# Altium PCB NewTrackerSenseBoard.PcbDoc (part 1 of 2)
Units mm, origin at the board's own origin, x right, y up, seen from the top; angles counter-clockwise.
Board outline 40 x 30 mm, 4 copper layers (L1 (SIG), L2 (GND), L3 (GND), L4 (SIG + PWR)), stack 1.566 mm thick; 46 components, 30 nets, 198 pads, 124 vias.
Unrouted connection lines stored in the file: 48.
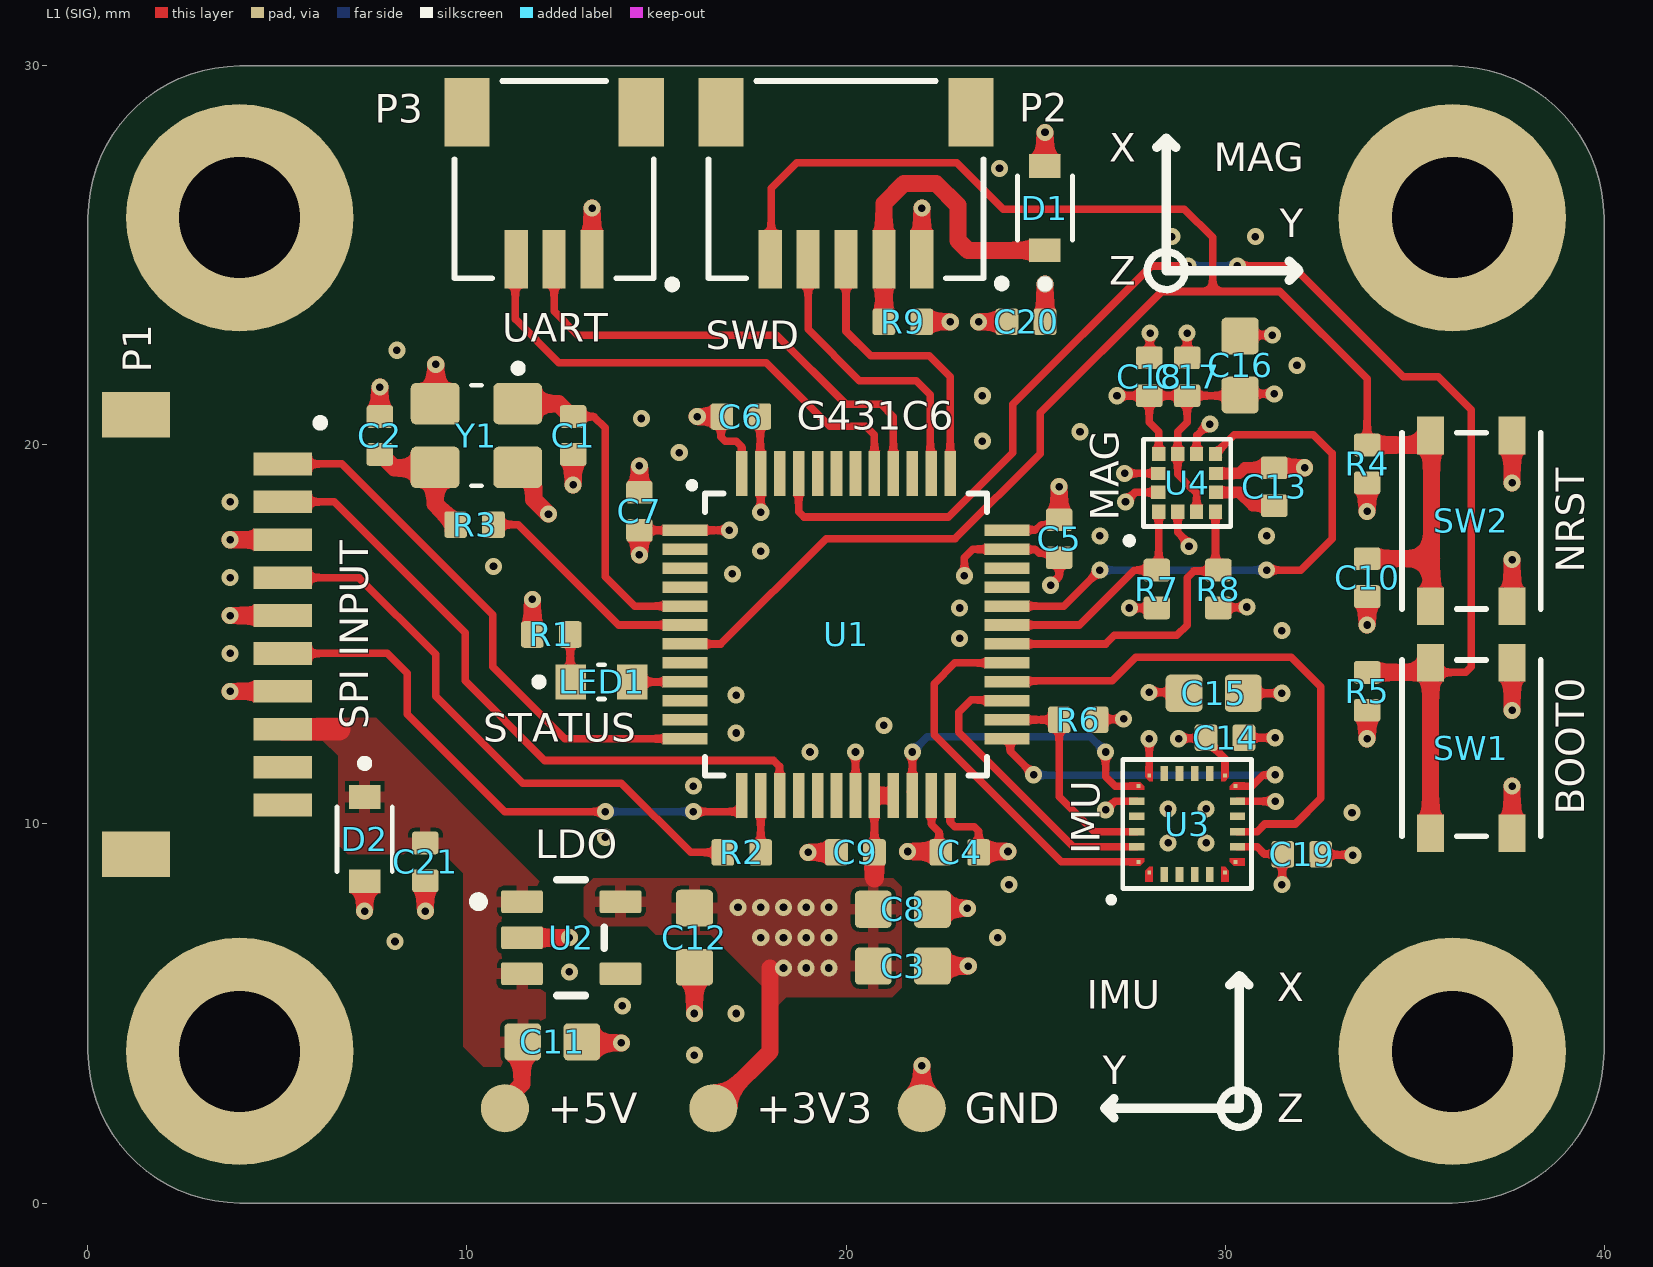
[diagram p0: L1 (SIG) view]
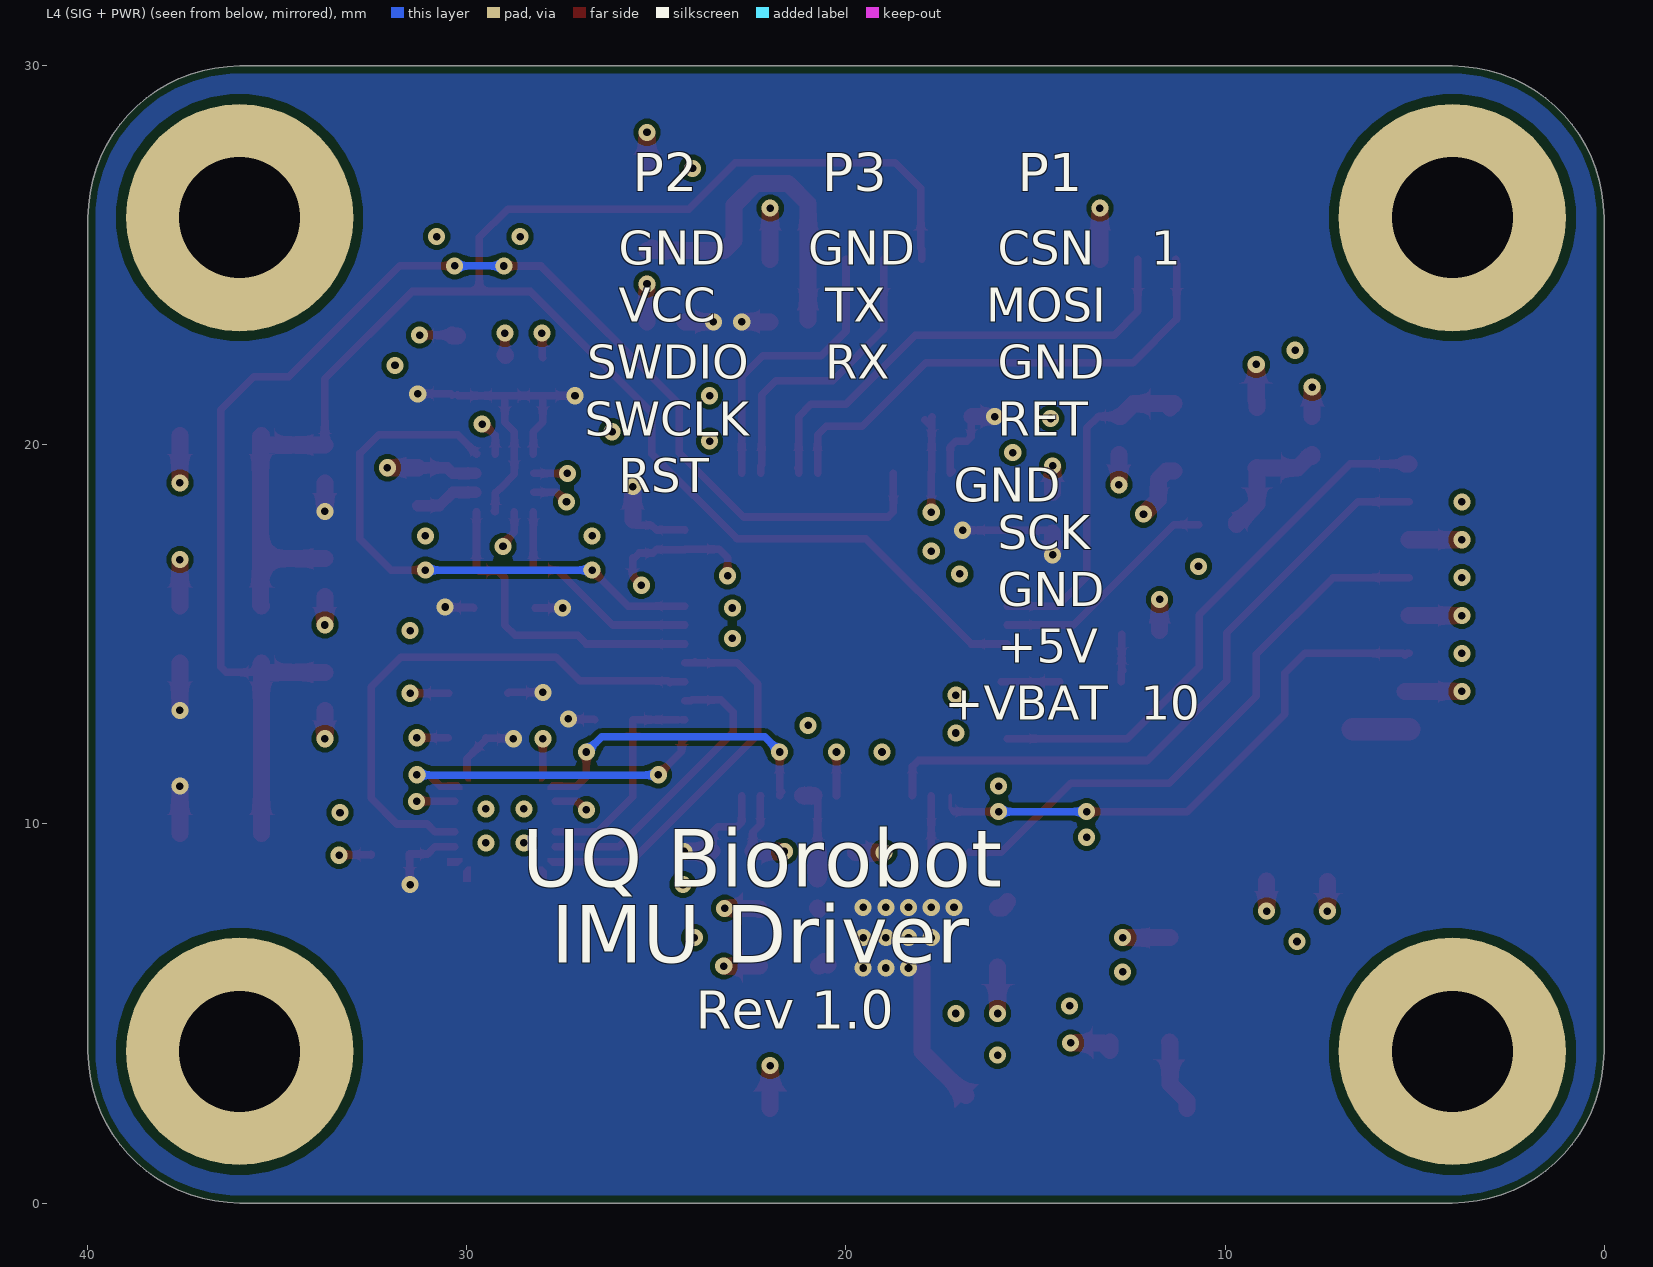
[diagram p1: L4 (SIG + PWR) view, seen from below]
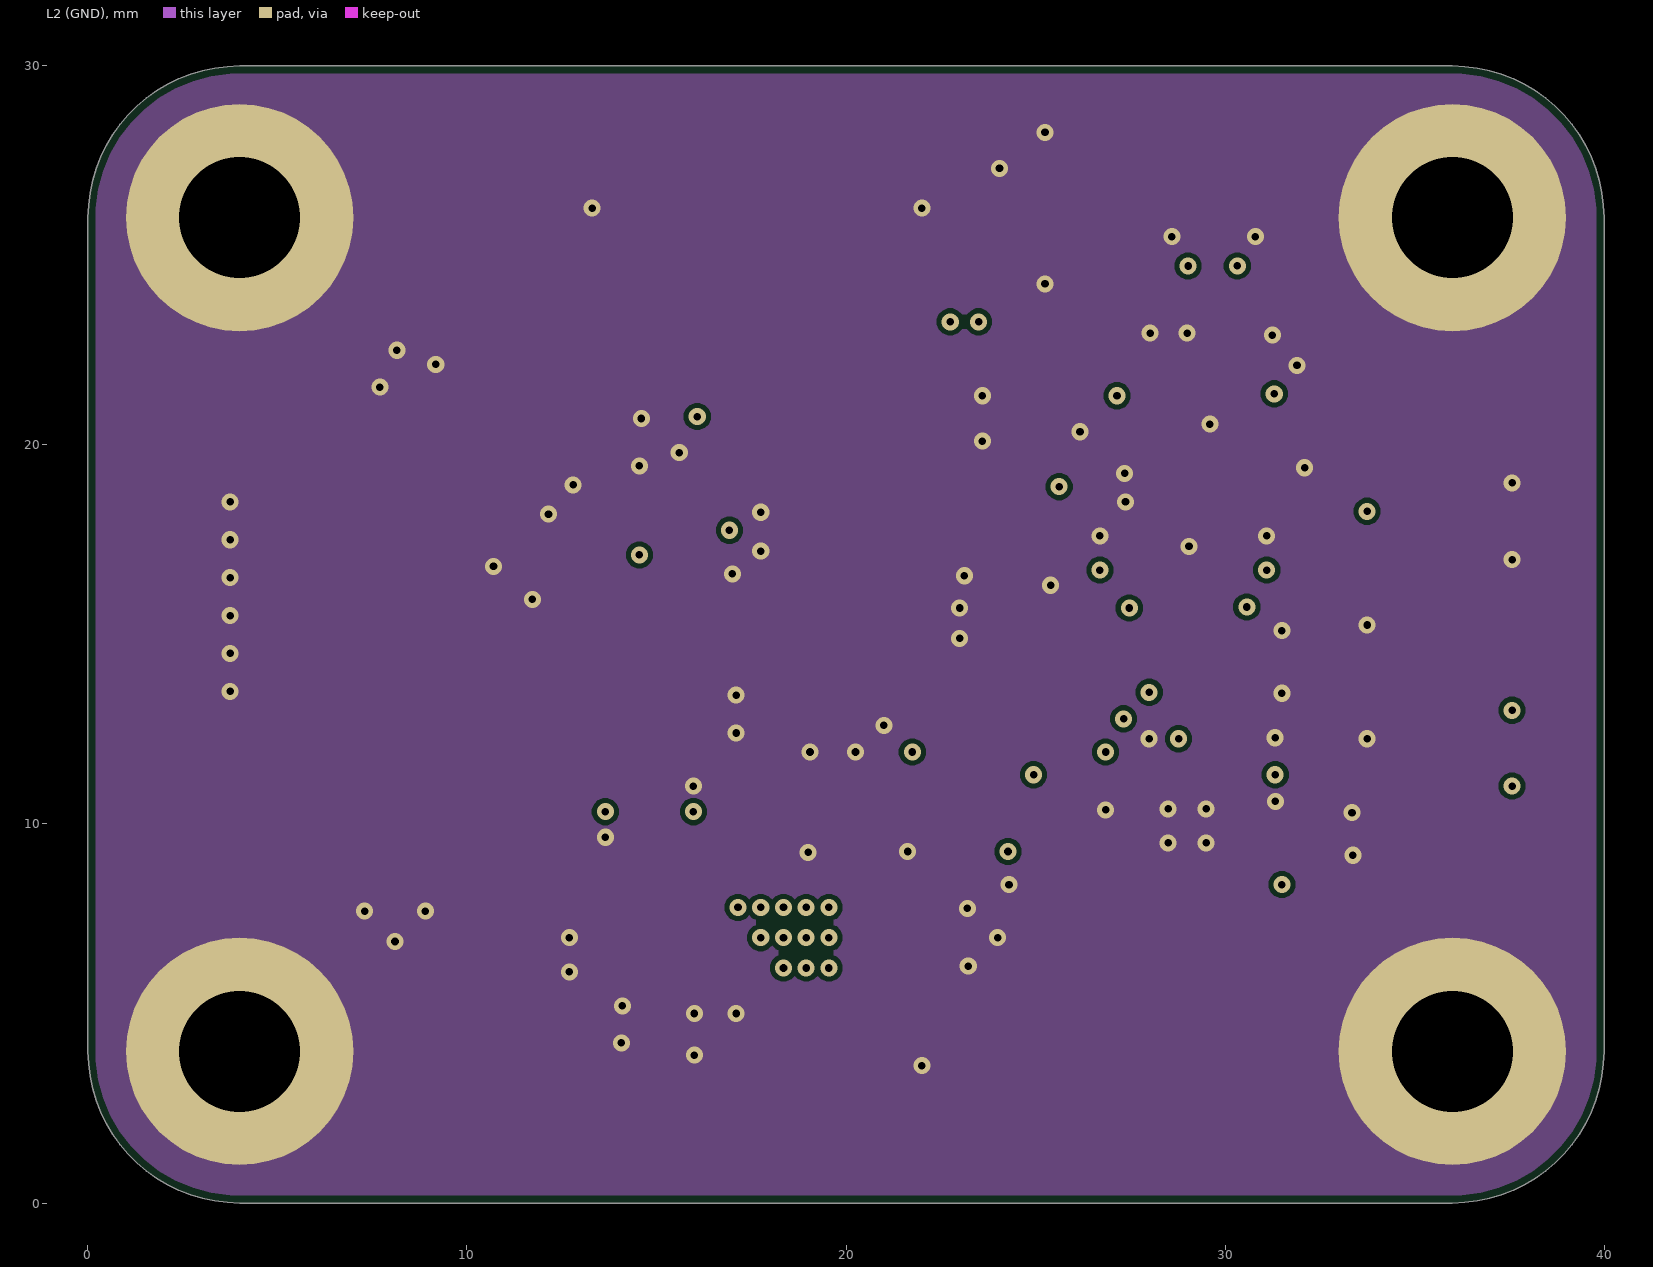
[diagram p2: L2 (GND)]
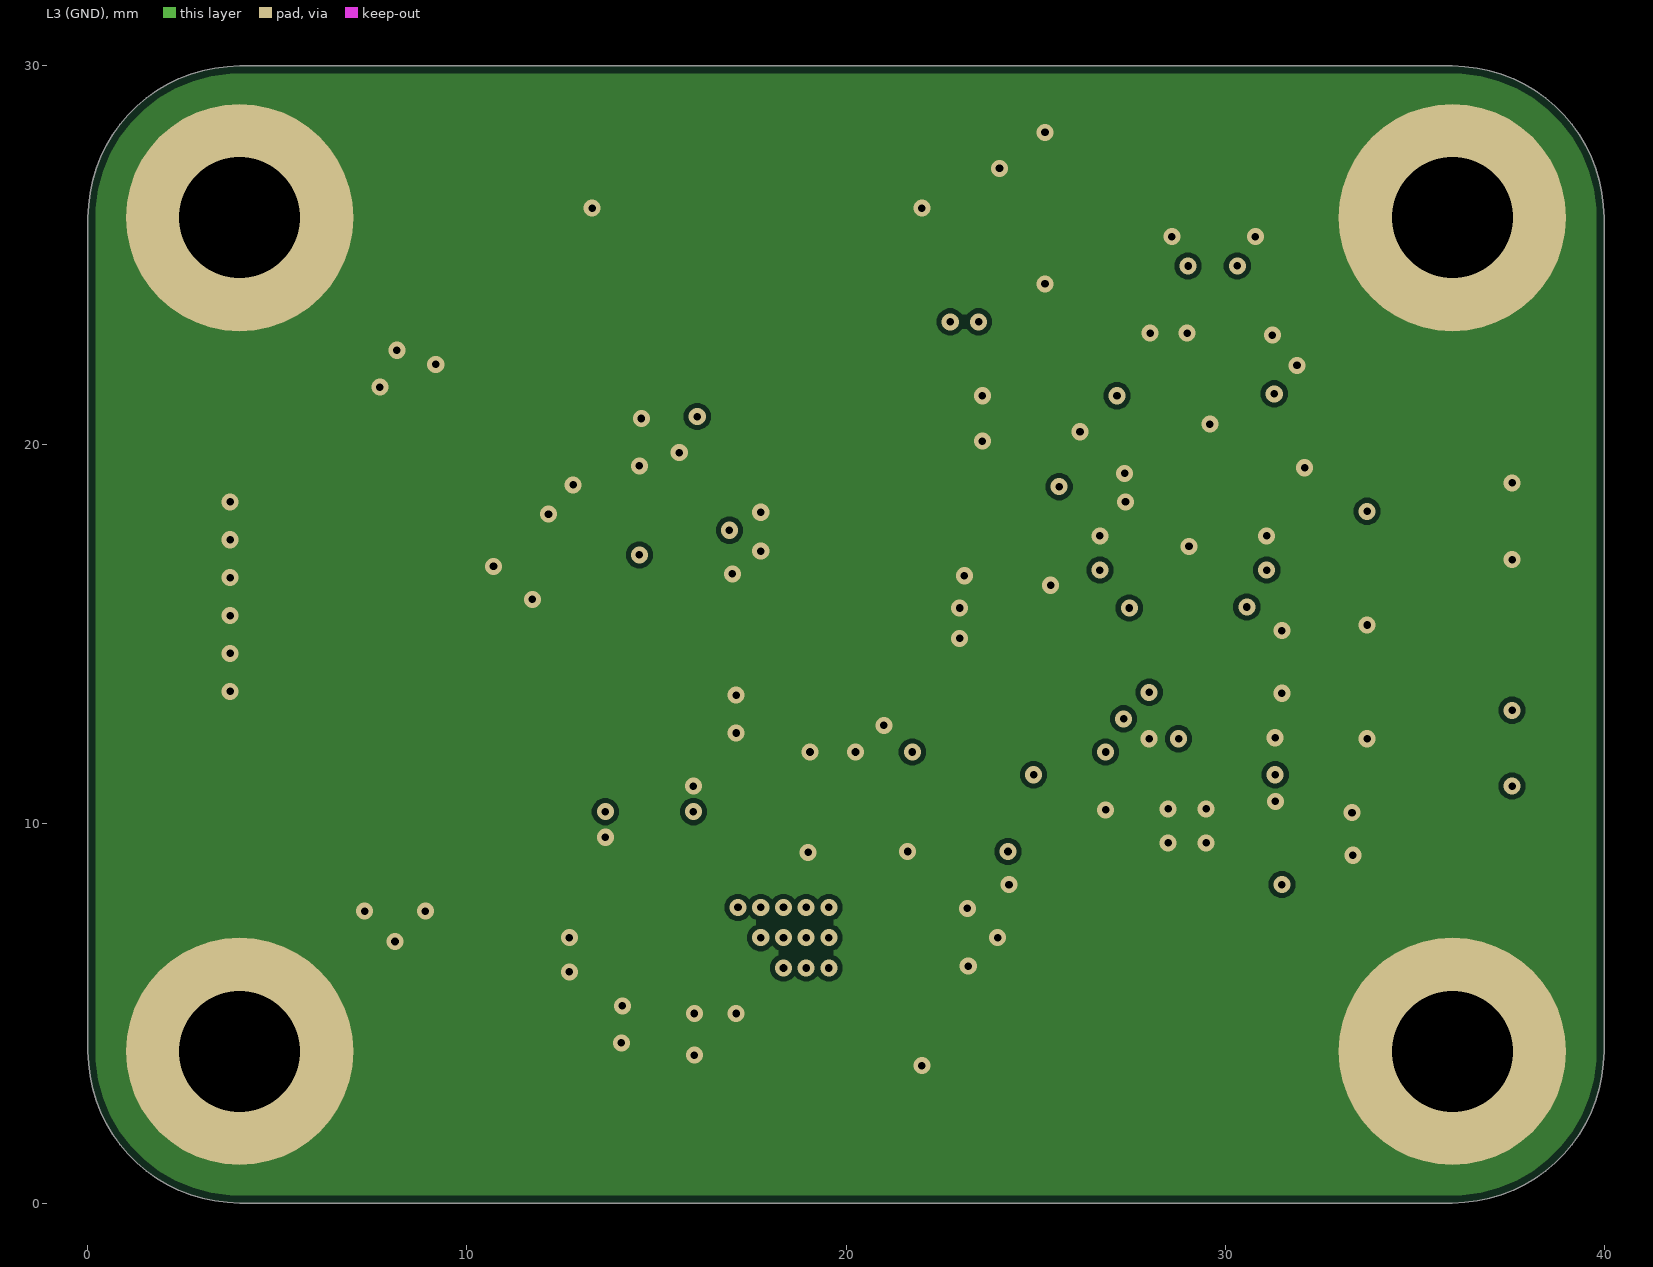
[diagram p3: L3 (GND)]
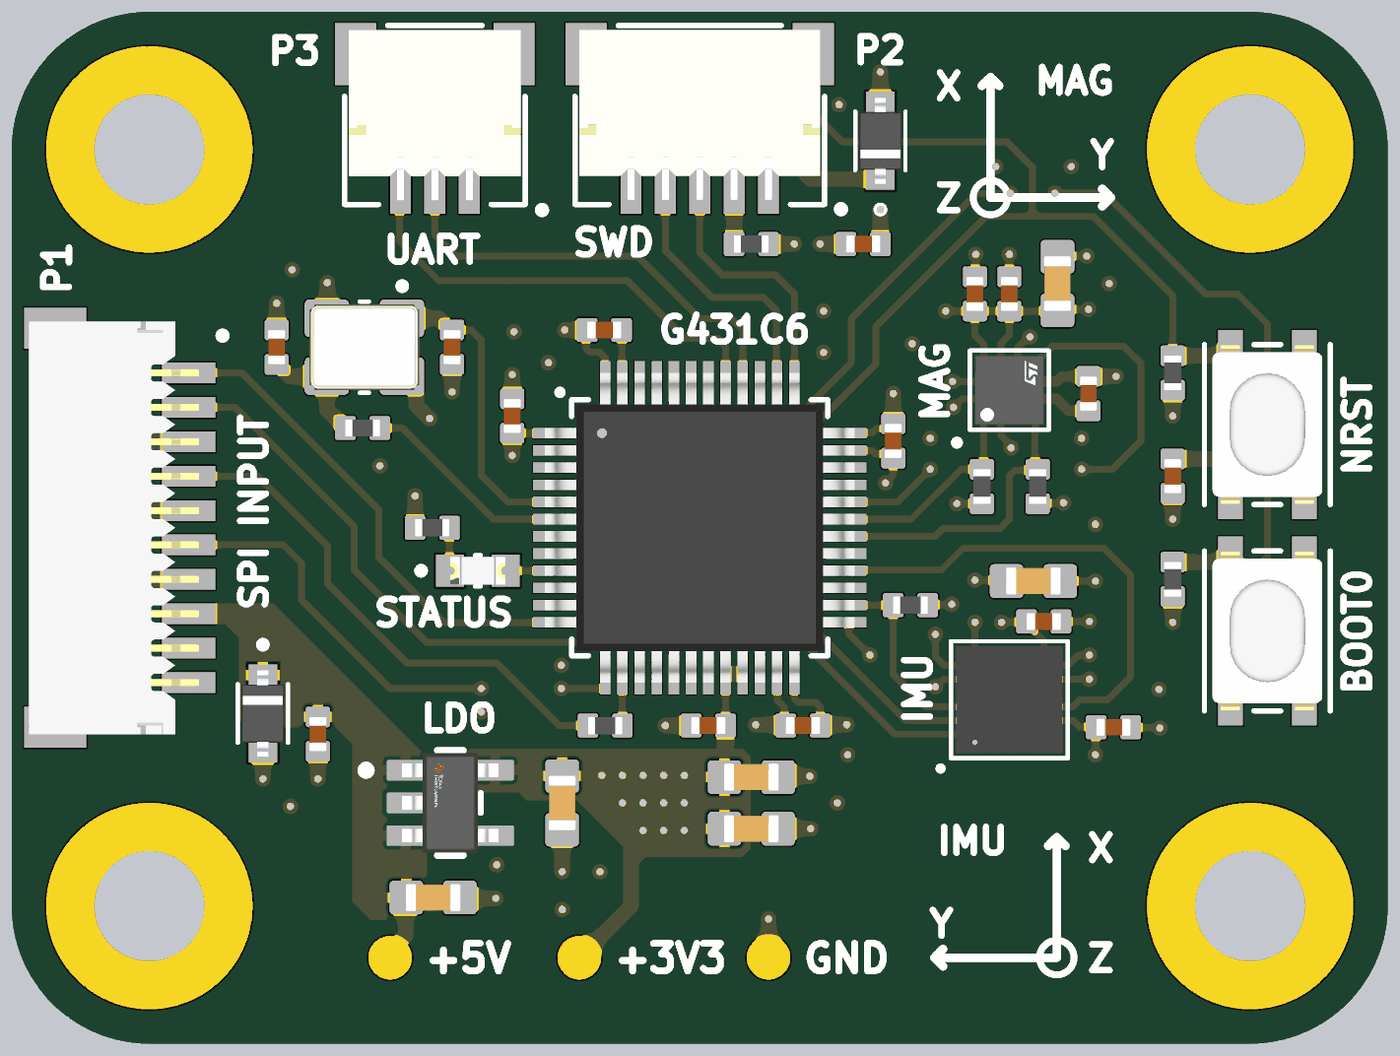
[diagram p4: 3D render of the assembled board from above, using the file's embedded part models]

## Layer stack, top to bottom
Top Solder: solder mask 0.0254, SM-001, Dk 4
L1 (SIG): signal copper 0.035
Dielectric 1: prepreg 0.203, PP-017, Dk 4.4
L2 (GND): signal copper 0.03
Dielectric 3: core 1.03, Core-039, Dk 4.6
L3 (GND): signal copper 0.03
Dielectric 5: prepreg 0.203, PP-017, Dk 4.4
L4 (SIG + PWR): signal copper 0.035
Bottom Solder: solder mask 0.0254, SM-001, Dk 4

## Board outline
0,4 0,26 cw(c4,26) 4,30 36,30 cw(c36,26) 40,26 40,4 cw(c36,4) 36,0 4,0 cw(c4,4)

## Design rules (kind name [scope] priority, off if disabled: settings)
BoardOutlineClearance [All] p1: gap=0.2 ignorepadtopadclearanceinfootprint=FALSE
Clearance [All] p1: gap=0.127 ignorepadtopadclearanceinfootprint=FALSE except(0.102: Arc-Text Track-Text SMDPad-Text THPad-Text Fill-Text Poly-Text Region-Text Text-Text; 0.12: Arc-Arc Arc-Track Track-Track; 0.15: Arc-SMDPad Arc-Via Track-SMDPad Track-Via SMDPad-SMDPad SMDPad-THPad THPad-THPad Fill-Fill Fill-Poly Fill-Region Poly-Poly Poly-Region Region-Region; 0.2: Arc-THPad Track-THPad; 0.25: Arc-Hole Track-Hole SMDPad-Hole THPad-Fill THPad-Poly THPad-Region THPad-Hole Via-Hole Fill-Hole Poly-Hole Region-Hole Text-Hole)
DiffPairsRouting [InDifferentialPairClass('USBCONN_DIFF')] p1: maxlimit=0.127 minlimit=0.102 mostfreqgap=0.127 toplayer_mingap=0.127 toplayer_minwidth=0.2 toplayer_maxwidth=0.2 toplayer_prefwidth=0.2 midlayer1_minwidth=0.381 midlayer1_maxwidth=0.381 midlayer1_prefwidth=0.381 midlayer2_minwidth=0.381 midlayer2_maxwidth=0.381 midlayer2_prefwidth=0.381 bottomlayer_mingap=0.127 bottomlayer_minwidth=0.2 bottomlayer_maxwidth=0.2 bottomlayer_prefwidth=0.2 impedanceprofiledriven=TRUE maxuncoupledlength=12.7
HoleSize [All] p1: absolutevalues=TRUE maxlimit=6.3 minlimit=0.2 maxpercent=80.000 minpercent=20.000
HoleToHoleClearance [All] p1: gap=0.25 allowstackedmicrovias=FALSE
MinimumAnnularRing [All] p1: minimumring=0.12
MinimumSolderMaskSliver [All] p1: minsoldermaskwidth=0.1
PlaneClearance [All] p1: clearance=0.15
PlaneConnect PlaneConnectPowerPads [InPadClass('PowerPads')] p1: planeconnectstyle=Direct reliefexpansion=0.508 reliefentries=4 reliefconductorwidth=0.254 reliefairgap=0.254
PlaneConnect [All] p2: planeconnectstyle=Direct reliefexpansion=0.3 reliefentries=4 reliefconductorwidth=1 reliefairgap=0.102
PolygonConnect PolygonConnectPowerPads [All vs (InPadClass('PowerPads'))] p1: connectstyle=Direct reliefconductorwidth=0.254 reliefentries=4 polygonreliefangle="90 Angle" airgapwidth=0.254
PolygonConnect [All] p2: thpad.connectstyle=Direct thpad.reliefconductorwidth=0.5 thpad.reliefentries=4 thpad.polygonreliefangle="90 Angle" thpad.airgapwidth=0.102 smdpad.connectstyle=Relief smdpad.reliefconductorwidth=0.3 smdpad.reliefentries=4 smdpad.polygonreliefangle="90 Angle" smdpad.airgapwidth=0.102 via.connectstyle=Direct via.reliefconductorwidth=0.5 via.reliefentries=4 via.polygonreliefangle="90 Angle" via.airgapwidth=0.102
RoutingVias [All] p1: holewidth=0.2 width=0.45 viastyle="Through Hole" minholewidth=0.2 minwidth=0.45 maxholewidth=0.2 maxwidth=0.45
SilkToSilkClearance [All] p1: silktosilkclearance=0
SilkToSolderMaskClearance [IsPad] p1: minsilkscreentomaskgap=0.102 clearancetoexposedcopper=TRUE
SolderMaskExpansion SolderMaskExpansion_1 [IsVia] p1: expansion=0.102 istentingtop=TRUE
SolderMaskExpansion [All] p2: expansion=0.075 istentingtop=FALSE
Width [All] p1: maxlimit=0.8 minlimit=0.102 preferedwidth=0.2 minimp=50.000000 maximp=50.000000 favimp=50.000000
22 further rules are at their usual default settings.

## Classes and differential pairs
component class U_Sensors: +3V3 +5v C11 C12 C13 C14 C15 C16 C17 C18 C19 GND IMU R6 R7 R8 U2 U3
component class U_Peripherals: C20 C21 D1 D2 P1 P2 P3 R9
component class U_Mechanical: H1 H2 H3 H4 HW1 HW2 HW3 HW4 HW5 HW6 HW7 HW8 HW9 HW10 HW11 HW12 P4 P5 P6 P7 P8 P9
component class U_MCU: C1 C2 C3 C4 C5 C6 C7 C8 C9 C10 LED1 R1 R2 R3 R4 R5 SW1 SW2 Y1

## Components (designator, comment, footprint, x,y, rotation, side; value= is the part's Value field where it differs from the comment)
+3V3 "50mil TEST_PAD" 15mil_TEST_PAD 16.5,2.5 r0 top (schematic designator TP3)
+5V "50mil TEST_PAD" 15mil_TEST_PAD 11,2.5 r0 top (schematic designator TP2)
C1 "12pF" 0402_Cap 12.8,20.25 r90 top
C2 "12pF" 0402_Cap 7.7,20.25 r90 top
C3 "10uF" 0603_CAP 21.5,6.25 r180 top
C4 "100nF" 0402_Cap 23,9.25 r0 top
C5 "100nF" 0402_Cap 25.625,17.525 r90 top
C6 "100nF" 0402_Cap 17.225,20.75 r180 top
C7 "100nF" 0402_Cap 14.55,18.25 r270 top
C8 "1uF" 0603_CAP 21.5,7.75 r180 top
C9 "10nF" 0402_Cap 20.25,9.25 r0 top
C10 "100nF" 0402_Cap 33.75,16.5 r90 top
C11 "1uF" 0603_CAP 12.25,4.25 r180 top
C12 "1uF" 0603_CAP 16,7 r90 top
C13 "220nF" 0402_Cap 31.3,18.9 r270 top
C14 "100nF" 0402_Cap 30,12.275 r180 top
C15 "2.2µF" 0603_CAP 29.7,13.45 r180 top
C16 "10uF" 0603_CAP 30.4,22.1 r270 top
C17 "100nF" 0402_Cap 29,21.8 r270 top
C18 "100nF" 0402_Cap 28,21.8 r270 top
C19 "10nF" 0402_Cap 32.025,9.2 r180 top
C20 "100nF" 0402_Cap 24.75,23.25 r180 top
C21 "100nF" 0402_Cap 8.9,9 r90 top
D1 "SD05" DIO_MM3Z3V0T1G 25.25,26.25 r90 top
D2 "SD05" DIO_MM3Z3V0T1G 7.3,9.6 r270 top
GND "50mil TEST_PAD" 15mil_TEST_PAD 22,2.5 r0 top (schematic designator TP1)
LED1 "GREEN" 0603_LED 13.55,13.75 r0 top
P1 "SM10B-SRSS-TB" SM10B-SRSS-TB 2.8,15 r270 top
P2 "SM05B-SRSS-TB" SM05B-SRSS-TB 20,27 r180 top
P3 "SM03B-SRSS-TB" SM03B-SRSS-TB 12.3,27 r180 top
R1 "300R" 0402_RES 12.225,15 r0 top
R2 "0R" 0402_RES 17.25,9.25 r0 top
R3 "0R" 0402_RES 10.2,17.9 r0 top
R4 "10K" 0402_RES 33.75,19.5 r270 top
R5 "10K" 0402_RES 33.75,13.5 r90 top
R6 "10K" 0402_RES 26.125,12.75 r0 top
R7 "3K3" 0402_RES 28.2,16.2 r270 top
R8 "3K3" 0402_RES 29.825,16.2 r270 top
R9 "0R" 0402_RES 21.5,23.25 r180 top
SW1 "SPST N.O. Button" "SW4_PTS815 SJM 250 SMTR LFS_CNK" 36.5,12 r270 top
SW2 "SPST N.O. Button" "SW4_PTS815 SJM 250 SMTR LFS_CNK" 36.5,18 r90 top
U1 "STM32G431C6T6" LQFP48-7x7mm 20,15 r0 top
U2 "TPS7A2033PDBVR" FP-DBV0005A-MFG 12.75,7 r0 top
U3 "ICM-40609-D" XDCR_ICM-40609-D 29,10 r90 top
U4 "IIS2MDCTR" FP-LGA-12-DM00170568-MFG 29,19 r90 top
Y1 "24MHz 9pF" OSCCC320X250X60 10.25,20.25 r180 top

## Footprints (in the part's own frame and the unit in brackets; to place one, negate y for a bottom-side part, rotate by r counter-clockwise, add the part's x,y. Pads: shape width x height; smd on the part's side, far side on the other; paste and mask are expansions set on the pad)
15mil_TEST_PAD [mm]
  round 1.27 smd paste-2539.97 mask+0.051: 1(0,0)
0402_Cap [mm]
  rrect25% 0.6x0.7 smd paste+0 mask+0.051: 1(-0.5,0) 2(0.5,0)
  body extent -0.5,-0.25 0.5,0.25, height 0.55
0402_RES [mm]
  rrect25% 0.6x0.7 smd paste+0 mask+0.051: 1(-0.5,0) 2(0.5,0)
  body extent -0.5,-0.25 0.5,0.25, height 0.4
0603_CAP [mm]
  rrect25% 0.972x0.981 smd mask+0.051: 1(-0.78,0) 2(0.78,0)
  body extent -0.8,-0.4 0.8,0.4, height 0.9
0603_LED [mm]
  rect 0.81x0.93 smd: A(0.81,0) C(-0.81,0)
  silkscreen extent -1.75,-0.45 0.08,0.45, body extent -0.8,-0.4 0.8,0.4, height 0.65
DIO_MM3Z3V0T1G [mm]
  rect 0.625x0.83 smd: A(1.113,0) K(-1.113,0)
  silkscreen extent -2.1,-0.73 0.85,0.73, body extent -1.25,-0.62 1.25,0.62, height 1
FP-DBV0005A-MFG [mm]
  rrect17% 1.1x0.6 smd paste+0 mask+0: 1(-1.3,0.95) 2(-1.3,0) 3(-1.3,-0.95) 4(1.3,-0.95) 5(1.3,0.95)
  silkscreen extent -2.57,-1.53 0.87,1.53, body extent -1.95,-1.78 1.95,1.78, height 0.25
FP-LGA-12-DM00170568-MFG [mm]
  rect 0.375x0.35 smd paste-1000 mask+0: 1(-0.763,0.75) 2(-0.763,0.25) 3(-0.763,-0.25) 4(-0.763,-0.75) 7(0.763,-0.75) 8(0.763,-0.25) 9(0.763,0.25) 10(0.763,0.75)
  rect 0.35x0.375 smd paste-1000 mask+0: 5(-0.25,-0.763) 6(0.25,-0.763) 11(0.25,0.763) 12(-0.25,0.763)
  silkscreen extent -1.57,-1.15 1.15,1.57, body extent -1,-1 1,1, height 0.7
LQFP48-7x7mm [mm]
  rect 1.194x0.305 smd paste+0 mask+0.025: 1(-4.25,2.75) 2(-4.25,2.25) 3(-4.25,1.75) 4(-4.25,1.25) 5(-4.25,0.75) 6(-4.25,0.25) 7(-4.25,-0.25) 8(-4.25,-0.75) 9(-4.25,-1.25) 10(-4.25,-1.75) 11(-4.25,-2.25) 12(-4.25,-2.75) 25(4.25,-2.75) 26(4.25,-2.25) 27(4.25,-1.75) 28(4.25,-1.25) 29(4.25,-0.75) 30(4.25,-0.25) 31(4.25,0.25) 32(4.25,0.75) 33(4.25,1.25) 34(4.25,1.75) 35(4.25,2.25) 36(4.25,2.75)
  rect 0.305x1.194 smd paste+0 mask+0.025: 13(-2.75,-4.25) 14(-2.25,-4.25) 15(-1.75,-4.25) 16(-1.25,-4.25) 17(-0.75,-4.25) 18(-0.25,-4.25) 19(0.25,-4.25) 20(0.75,-4.25) 21(1.25,-4.25) 22(1.75,-4.25) 23(2.25,-4.25) 24(2.75,-4.25) 37(2.75,4.25) 38(2.25,4.25) 39(1.75,4.25) 40(1.25,4.25) 41(0.75,4.25) 42(0.25,4.25) 43(-0.25,4.25) 44(-0.75,4.25) 45(-1.25,4.25) 46(-1.75,4.25) 47(-2.25,4.25) 48(-2.75,4.25)
  silkscreen extent -4.14,-3.72 3.72,4.01, body extent -4.5,-4.5 4.5,4.5, height 1.6
OSCCC320X250X60 [mm]
  rrect25% 1.29x1.09 smd mask+0.051: 1(-1.09,-0.84) 2(1.09,-0.84) 3(1.09,0.84) 4(-1.09,0.84)
  silkscreen extent -1.2,-1.87 0.13,1.33, body extent -1.6,-1.25 1.6,1.25, height 0.6
SM03B-SRSS-TB [mil]
  rect 24x61 smd paste+0 mask+2: 1(-39.37,82.68) 2(0,82.68) 3(39.37,82.68)
  rect 47x71 smd mask+2: P-MOUNT1(-90.55,-69.88) P-MOUNT2(90.55,-69.88)
  silkscreen extent -126,-102 103,112, body extent -98,-97 98,98, height 116
SM05B-SRSS-TB [mil]
  rect 24x61 smd paste+0 mask+2: 1(-78.74,82.68) 2(-39.37,82.68) 3(0,82.68) 4(39.37,82.68) 5(78.74,82.68)
  rect 47x71 smd mask+2: P-MOUNT1(-129.92,-69.88) P-MOUNT2(129.92,-69.88)
  silkscreen extent -165,-102 143,111, body extent -138,-97 138,97, height 116
SM10B-SRSS-TB [mm]
  rect 0.6x1.55 smd mask+0.051: 1(-4.5,2.342) 2(-3.5,2.342) 3(-2.5,2.342) 4(-1.5,2.342) 5(-0.5,2.342) 6(0.5,2.342) 7(1.5,2.342) 8(2.5,2.342) 9(3.5,2.342) 10(4.5,2.342)
  rect 1.2x1.8 smd mask+0.051: P-MOUNT1(-5.8,-1.533) P-MOUNT2(5.8,-1.533)
  silkscreen extent -5.66,3.25 -5.51,3.41, body extent -6,-2.3 6,2.65, height 2.97
"SW4_PTS815 SJM 250 SMTR LFS_CNK" [mil]
  rect 39x28 smd paste+0 mask+2: 1(-88.58,42.32) 2(88.58,42.32) 3(-88.58,-42.32) 4(88.58,-42.32)
  silkscreen extent -92,-72 92,72, body extent -91,-63 91,63, height 106
XDCR_ICM-40609-D [mm]
  rect 0.1x0.1 smd paste-1 mask+0: 1(-1.28,1) 6(-1.28,-1) 7(-1,-1.28) 12(1,-1.28) 13(1.28,-1) 18(1.28,1) 19(1,1.28) 24(-1,1.28)
  rect 0.4x0.2 smd paste-0.006 mask+0.025: 2(-1.33,0.6) 3(-1.33,0.2) 4(-1.33,-0.2) 5(-1.33,-0.6) 14(1.33,-0.6) 15(1.33,-0.2) 16(1.33,0.2) 17(1.33,0.6)
  rect 0.2x0.4 smd paste-0.006 mask+0.025: 8(-0.6,-1.33) 9(-0.2,-1.33) 10(0.2,-1.33) 11(0.6,-1.33) 20(0.6,1.33) 21(0.2,1.33) 22(-0.2,1.33) 23(-0.6,1.33)
  L1 (SIG) region: 1.525,-1.1 1.23,-1.1 1.13,-1 1.13,-0.9 1.525,-0.9
  L1 (SIG) region: -1.13,1 -1.13,0.9 -1.525,0.9 -1.525,1.1 -1.23,1.1
  L1 (SIG) region: -1.13,-1 -1.23,-1.1 -1.525,-1.1 -1.525,-0.9 -1.13,-0.9
  L1 (SIG) region: -0.9,-1.525 -1.1,-1.525 -1.1,-1.23 -1,-1.13 -0.9,-1.13
  L1 (SIG) region: 1.1,-1.23 1.1,-1.525 0.9,-1.525 0.9,-1.13 1,-1.13
  L1 (SIG) region: 1.525,0.9 1.13,0.9 1.13,1 1.23,1.1 1.525,1.1
  L1 (SIG) region: 1.1,1.23 1,1.13 0.9,1.13 0.9,1.525 1.1,1.525
  L1 (SIG) region: -0.9,1.13 -1,1.13 -1.1,1.23 -1.1,1.525 -0.9,1.525
  silkscreen extent -2.05,-1.7 1.7,2.05, body extent -1.55,-1.55 1.55,1.55, height 0.97

## Part data
C1 C2: library part GJM1555C1H120FB01D, "12 pF, 50 V, ± 1%, C0G (NP0), 0402 [1005 Metric]", Case Code (Imperial)=0402, Case Code (Metric)=1005, Dielectric=C0G, Dielectric Material=Ceramic, Manufacturer=Murata, Manufacturer Lifecycle Status="IN PRODUCTION", Max Operating Temperature=125°C, Min Operating Temperature=-55°C, Supplier Part Number 1=490-11190-1-ND, Temperature Coefficient=30ppm/°C, Tolerance=±1%, Voltage Rating=50V, Capacitance=12pF, Case/Package=0402, Category="Ceramic Capacitors", ComponentLink1Description=https://datasheet.octopart.com:443/GJM1555C1H120FB01D-Murata-datasheet-165579666.pdf?src-supplier=TME, ComponentLink1URL=https://datasheet.octopart.com:443/GJM1555C1H120FB01D-Murata-datasheet-165579666.pdf?src-supplier=TME, ComponentLink2Description=https://datasheet.octopart.com:443/GJM1555C1H120FB01D-Murata-datasheet-12511495.pdf?src-supplier=TME, ComponentLink2URL=https://datasheet.octopart.com:443/GJM1555C1H120FB01D-Murata-datasheet-12511495.pdf?src-supplier=TME, ComponentLink3Description=https://datasheet.octopart.com:443/GJM1555C1H120FB01D-Murata-datasheet-141266224.pdf?src-supplier=Ciiva, ComponentLink3URL=https://datasheet.octopart.com:443/GJM1555C1H120FB01D-Murata-datasheet-141266224.pdf?src-supplier=Ciiva, ComponentLink4Description=https://datasheet.octopart.com:443/GJM1555C1H120FB01D-Murata-datasheet-140665264.pdf?src-supplier=Ciiva, ComponentLink4URL=https://datasheet.octopart.com:443/GJM1555C1H120FB01D-Murata-datasheet-140665264.pdf?src-supplier=Ciiva, ComponentLink5Description=https://datasheet.octopart.com:443/GJM1555C1H120FB01D-Murata-datasheet-138724487.pdf?src-supplier=Ciiva, ComponentLink5URL=https://datasheet.octopart.com:443/GJM1555C1H120FB01D-Murata-datasheet-138724487.pdf?src-supplier=Ciiva, ComponentLink6Description=https://datasheet.octopart.com/GJM1555C1H120FB01D-Murata-datasheet-12515295.pdf, ComponentLink6URL=https://datasheet.octopart.com/GJM1555C1H120FB01D-Murata-datasheet-12515295.pdf, ComponentLink7Description=https://datasheet.octopart.com/GJM1555C1H120FB01D-Murata-datasheet-12510076.pdf, ComponentLink7URL=https://datasheet.octopart.com/GJM1555C1H120FB01D-Murata-datasheet-12510076.pdf, ComponentLink8Description=https://datasheet.octopart.com/GJM1555C1H120FB01D-Murata-datasheet-11978611.pdf, ComponentLink8URL=https://datasheet.octopart.com/GJM1555C1H120FB01D-Murata-datasheet-11978611.pdf, ComponentLink9Description=https://datasheet.octopart.com/GJM1555C1H120FB01D-Murata-datasheet-10025737.pdf, ComponentLink9URL=https://datasheet.octopart.com/GJM1555C1H120FB01D-Murata-datasheet-10025737.pdf, ComponentLink10Description=https://datasheet.octopart.com/GJM1555C1H120FB01D-Murata-datasheet-8819587.pdf, ComponentLink10URL=https://datasheet.octopart.com/GJM1555C1H120FB01D-Murata-datasheet-8819587.pdf, ComponentLink11Description=https://datasheet.octopart.com/GJM1555C1H120FB01D-Murata-datasheet-14407173.pdf, ComponentLink11URL=https://datasheet.octopart.com/GJM1555C1H120FB01D-Murata-datasheet-14407173.pdf, ComponentLink12Description=http://sigma.octopart.com:80/reach_statement/Murata-company-16.pdf?src-supplier=Compliance+Statements, ComponentLink12URL=http://sigma.octopart.com:80/reach_statement/Murata-company-16.pdf?src-supplier=Compliance+Statements, Depth=500µm, Export Control Classification Number (ECCN) Code=EAR99, Harmonized Tariff Schedule (HTS) Code=8532.24.00.20, Height=500µm, Introduction Date=2013-11-20, Length=1mm, Lifecycle Status=Production, Manufacturer Part Number=GJM1555C1H120FB01D, Material=Ceramic, Mount="Surface Mount", Number of Terminals=2, Pricing 1="1=0.16, 10=0.089, 50=0.0628, 100=0.0546, 500=0.04104, 1000=0.03687, 2500=0.03246, 5000=0.02982 (USD)", Radiation Hardening=No, REACH SVHC=Yes, RoHS=Compliant, Schedule B="8532240020, 8532240020|8532240020|8532240020|8532240020|8532240020", Stock 1=7555649, Supplier 1=DigiKey, Termination=SMD/SMT, Thickness=500µm, Voltage Rating (DC)=50V, Width=500µm
C3 C16: library part GRM188R61E106KA73J, "25V 10uF X7R ±10% 0603 Multilayer Ceramic Capacitors MLCC - SMD/SMT ROHS", Capacitance=10µF, Case/Package=0603, Dielectric=X5R, Dielectric Material=Ceramic, Manufacturer=Murata, Manufacturer Lifecycle Status="IN PRODUCTION", Max Operating Temperature=85°C, Min Operating Temperature=-55°C, Supplier Part Number 1=490-GRM188R61E106KA73JCT-ND, Tolerance=±10%, Voltage Rating=25V, Category="Ceramic Capacitors", ComponentLink1Description=https://datasheet.octopart.com:443/GRM188R61E106KA73J-Murata-datasheet-165579666.pdf?src-supplier=TME, ComponentLink1URL=https://datasheet.octopart.com:443/GRM188R61E106KA73J-Murata-datasheet-165579666.pdf?src-supplier=TME, ComponentLink2Description=https://datasheet.octopart.com:443/GRM188R61E106KA73J-Murata-datasheet-141274968.pdf?src-supplier=Ciiva, ComponentLink2URL=https://datasheet.octopart.com:443/GRM188R61E106KA73J-Murata-datasheet-141274968.pdf?src-supplier=Ciiva, ComponentLink3Description=https://datasheet.octopart.com:443/GRM188R61E106KA73J-Murata-datasheet-140704821.pdf?src-supplier=Ciiva, ComponentLink3URL=https://datasheet.octopart.com:443/GRM188R61E106KA73J-Murata-datasheet-140704821.pdf?src-supplier=Ciiva, ComponentLink4Description=https://datasheet.octopart.com:443/GRM188R61E106KA73J-Murata-datasheet-138742889.pdf?src-supplier=Ciiva, ComponentLink4URL=https://datasheet.octopart.com:443/GRM188R61E106KA73J-Murata-datasheet-138742889.pdf?src-supplier=Ciiva, ComponentLink5Description=https://datasheet.octopart.com/GRM188R61E106KA73J-Murata-datasheet-12515295.pdf, ComponentLink5URL=https://datasheet.octopart.com/GRM188R61E106KA73J-Murata-datasheet-12515295.pdf, ComponentLink6Description=https://datasheet.octopart.com/GRM188R61E106KA73J-Murata-datasheet-12510076.pdf, ComponentLink6URL=https://datasheet.octopart.com/GRM188R61E106KA73J-Murata-datasheet-12510076.pdf, ComponentLink7Description=https://datasheet.octopart.com/GRM188R61E106KA73J-Murata-datasheet-11978611.pdf, ComponentLink7URL=https://datasheet.octopart.com/GRM188R61E106KA73J-Murata-datasheet-11978611.pdf, ComponentLink8Description=https://datasheet.octopart.com/GRM188R61E106KA73J-Murata-datasheet-10025737.pdf, ComponentLink8URL=https://datasheet.octopart.com/GRM188R61E106KA73J-Murata-datasheet-10025737.pdf, ComponentLink9Description=https://datasheet.octopart.com/GRM188R61E106KA73J-Murata-datasheet-8819587.pdf, ComponentLink9URL=https://datasheet.octopart.com/GRM188R61E106KA73J-Murata-datasheet-8819587.pdf, ComponentLink10Description=http://sigma.octopart.com:80/reach_statement/Murata-company-16.pdf?src-supplier=Compliance+Statements, ComponentLink10URL=http://sigma.octopart.com:80/reach_statement/Murata-company-16.pdf?src-supplier=Compliance+Statements, Height=800µm, Length=1.6mm, Lifecycle Status=Production, Manufacturer Part Number=GRM188R61E106KA73J, Material=Ceramic, Mount="Surface Mount", Number of Terminals=2, Pricing 1="1=0.26, 10=0.149, 50=0.1072, 100=0.0945, 500=0.07304, 1000=0.06643, 2500=0.05947, 5000=0.05528 (USD)", REACH SVHC=Yes, RoHS=Compliant, Stock 1=170211, Supplier 1=DigiKey, Thickness=800µm, Voltage Rating (DC)=25V, Width=800µm
C4 C5 C6 C7 C10 C14 C17 C18 C20 C21: library part GCM155R71H104KE02J, "50V 100nF X7R ±10% 0402 Multilayer Ceramic Capacitors MLCC - SMD/SMT ROHS", Case Code (Imperial)=0402, Case Code (Metric)=1005, Dielectric=X7R, Dielectric Material=Ceramic, Manufacturer=Murata, Manufacturer Lifecycle Status="IN PRODUCTION", Max Operating Temperature=125°C, Min Operating Temperature=-55°C, Ratings=AEC-Q200, Supplier Part Number 1=490-14514-6-ND, Tolerance=±10%, Voltage Rating=50V, Capacitance=100nF, Case/Package=0402, Category="Ceramic Capacitors", ComponentLink1Description=https://datasheet.octopart.com:443/GCM155R71H104KE02J-Murata-datasheet-155345015.pdf?src-supplier=Newark, ComponentLink1URL=https://datasheet.octopart.com:443/GCM155R71H104KE02J-Murata-datasheet-155345015.pdf?src-supplier=Newark, ComponentLink2Description=https://datasheet.octopart.com:443/GCM155R71H104KE02J-Murata-datasheet-178519985.pdf?src-supplier=Arrow.cn, ComponentLink2URL=https://datasheet.octopart.com:443/GCM155R71H104KE02J-Murata-datasheet-178519985.pdf?src-supplier=Arrow.cn, ComponentLink3Description=https://datasheet.octopart.com:443/GCM155R71H104KE02J-Murata-datasheet-141266224.pdf?src-supplier=Ciiva, ComponentLink3URL=https://datasheet.octopart.com:443/GCM155R71H104KE02J-Murata-datasheet-141266224.pdf?src-supplier=Ciiva, ComponentLink4Description=https://datasheet.octopart.com:443/GCM155R71H104KE02J-Murata-datasheet-140656751.pdf?src-supplier=Ciiva, ComponentLink4URL=https://datasheet.octopart.com:443/GCM155R71H104KE02J-Murata-datasheet-140656751.pdf?src-supplier=Ciiva, ComponentLink5Description=https://datasheet.octopart.com:443/GCM155R71H104KE02J-Murata-datasheet-138716456.pdf?src-supplier=Ciiva, ComponentLink5URL=https://datasheet.octopart.com:443/GCM155R71H104KE02J-Murata-datasheet-138716456.pdf?src-supplier=Ciiva, ComponentLink6Description=https://datasheet.octopart.com:443/GCM155R71H104KE02J-Murata-datasheet-77992203.pdf?src-supplier=Future+Electronics, ComponentLink6URL=https://datasheet.octopart.com:443/GCM155R71H104KE02J-Murata-datasheet-77992203.pdf?src-supplier=Future+Electronics, ComponentLink7Description=https://datasheet.octopart.com:443/GCM155R71H104KE02J-Murata-datasheet-12511495.pdf?src-supplier=TME, ComponentLink7URL=https://datasheet.octopart.com:443/GCM155R71H104KE02J-Murata-datasheet-12511495.pdf?src-supplier=TME, ComponentLink8Description=http://sigma.octopart.com:80/reach_statement/Murata-company-16.pdf?src-supplier=Compliance+Statements, ComponentLink8URL=http://sigma.octopart.com:80/reach_statement/Murata-company-16.pdf?src-supplier=Compliance+Statements, Country of Origin=Philippines, Export Control Classification Number (ECCN) Code=EAR99, Harmonized Tariff Schedule (HTS) Code=8532.24.00.20, Height=500µm, Introduction Date=2013-11-20, Length=1mm, Lifecycle Status=Production, Manufacturer Part Number=GCM155R71H104KE02J, Material=Ceramic, Mount="Surface Mount", Number of Terminals=2, Packaging="Tape & Reel (TR)", Pricing 1="1=0.1, 10=0.034, 50=0.0226, 100=0.0193, 500=0.01374, 1000=0.01205, 2500=0.01027, 5000=0.0092 (USD)", REACH SVHC=Yes, RoHS=Compliant, Schedule B="8532240020, 8532240020|8532240020, 8532240020|8532240020|8532240020, 8532240020|8532240020|8532240020|8532240020", Stock 1=13930662, Supplier 1=DigiKey, Termination=SMD/SMT, Voltage Rating (DC)=50V, Weight=6.010099mg, Width=500µm
C8 C11 C12: library part GCM188R71E105KA64D, "25V 1uF X7R ±10% 0603 Multilayer Ceramic Capacitors MLCC - SMD/SMT ROHS", Capacitance=1µF, Case Code (Imperial)=0603, Case Code (Metric)=1608, Dielectric=X7R, Dielectric Material=Ceramic, Manufacturer=Murata, Manufacturer Lifecycle Status="IN PRODUCTION", Max Operating Temperature=125°C, Min Operating Temperature=-55°C, Ratings=AEC-Q200, Supplier Part Number 1=490-10673-1-ND, Tolerance=±10%, Voltage=25V, Case/Package=0603, Category="Ceramic Capacitors", ComponentLink1Description=https://datasheet.octopart.com:443/GCM188R71E105KA64D-Murata-datasheet-39128443.pdf?src-supplier=Newark, ComponentLink1URL=https://datasheet.octopart.com:443/GCM188R71E105KA64D-Murata-datasheet-39128443.pdf?src-supplier=Newark, ComponentLink2Description=https://datasheet.octopart.com:443/GCM188R71E105KA64D-Murata-datasheet-62316951.pdf?src-supplier=element14+APAC, ComponentLink2URL=https://datasheet.octopart.com:443/GCM188R71E105KA64D-Murata-datasheet-62316951.pdf?src-supplier=element14+APAC, ComponentLink3Description=https://datasheet.octopart.com:443/GCM188R71E105KA64D-Murata-datasheet-141267554.pdf?src-supplier=Geoflip, ComponentLink3URL=https://datasheet.octopart.com:443/GCM188R71E105KA64D-Murata-datasheet-141267554.pdf?src-supplier=Geoflip, ComponentLink4Description=https://datasheet.octopart.com:443/GCM188R71E105KA64D-Murata-datasheet-140658666.pdf?src-supplier=Ciiva, ComponentLink4URL=https://datasheet.octopart.com:443/GCM188R71E105KA64D-Murata-datasheet-140658666.pdf?src-supplier=Ciiva, ComponentLink5Description=https://datasheet.octopart.com:443/GCM188R71E105KA64D-Murata-datasheet-138718232.pdf?src-supplier=Ciiva, ComponentLink5URL=https://datasheet.octopart.com:443/GCM188R71E105KA64D-Murata-datasheet-138718232.pdf?src-supplier=Ciiva, ComponentLink6Description=https://datasheet.octopart.com:443/GCM188R71E105KA64D-Murata-datasheet-81455541.pdf?src-supplier=TME, ComponentLink6URL=https://datasheet.octopart.com:443/GCM188R71E105KA64D-Murata-datasheet-81455541.pdf?src-supplier=TME, ComponentLink7Description=https://datasheet.octopart.com/GCM188R71E105KA64D-Murata-datasheet-14404430.pdf, ComponentLink7URL=https://datasheet.octopart.com/GCM188R71E105KA64D-Murata-datasheet-14404430.pdf, ComponentLink8Description=https://datasheet.octopart.com:443/GCM188R71E105KA64D-Murata-datasheet-14393380.pdf?src-supplier=Future+Electronics, ComponentLink8URL=https://datasheet.octopart.com:443/GCM188R71E105KA64D-Murata-datasheet-14393380.pdf?src-supplier=Future+Electronics, ComponentLink9Description=https://datasheet.octopart.com:443/GCM188R71E105KA64D-Murata-datasheet-44103482.pdf?src-supplier=Future+Electronics, ComponentLink9URL=https://datasheet.octopart.com:443/GCM188R71E105KA64D-Murata-datasheet-44103482.pdf?src-supplier=Future+Electronics, ComponentLink10Description=http://sigma.octopart.com:80/reach_statement/Murata-company-16.pdf?src-supplier=Compliance+Statements, ComponentLink10URL=http://sigma.octopart.com:80/reach_statement/Murata-company-16.pdf?src-supplier=Compliance+Statements, Country of Origin=Philippines, Depth=800µm, Export Control Classification Number (ECCN) Code=EAR99, Harmonized Tariff Schedule (HTS) Code=8532.24.00.20, Height=800µm, Introduction Date=2010-10-29, Lead Free="Lead Free", Length=1.6mm, Lifecycle Status=Production, Manufacturer Part Number=GCM188R71E105KA64D, Material=Ceramic, Mount="Surface Mount", Number of Terminals=2, Packaging="Cut Tape", Pricing 1="1=0.19, 10=0.106, 50=0.0752, 100=0.0658, 500=0.04994, 1000=0.04504 (USD)", Radiation Hardening=No, REACH SVHC=Yes, RoHS=Compliant, Schedule B="8532240020, 8532240020|8532240020, 8532240020|8532240020|8532240020, 8532240020|8532240020|8532240020|8532240020", Stock 1=751115, Supplier 1=DigiKey, Termination=SMD/SMT, Voltage Rating=25V, Voltage Rating (DC)=25V, Weight=6.293594mg, Width=800µm
C9 C19: library part GCM155R71H103KA55D, "50V 10nF X7R ±10% 0402 Multilayer Ceramic Capacitors MLCC - SMD/SMT ROHS", Case Code (Imperial)=0402, Case Code (Metric)=1005, Dielectric=X7R, Dielectric Material=Ceramic, Manufacturer=Murata, Manufacturer Lifecycle Status="IN PRODUCTION", Max Operating Temperature=125°C, Min Operating Temperature=-55°C, Ratings=AEC-Q200, Supplier Part Number 1=490-4762-6-ND, Tolerance=±10%, Voltage=50V, Capacitance=10nF, Case/Package=0402, Category="Ceramic Capacitors", ComponentLink1Description=https://datasheet.octopart.com:443/GCM155R71H103KA55D-Murata-datasheet-149522462.pdf?src-supplier=Farnell, ComponentLink1URL=https://datasheet.octopart.com:443/GCM155R71H103KA55D-Murata-datasheet-149522462.pdf?src-supplier=Farnell, ComponentLink2Description=https://datasheet.octopart.com:443/GCM155R71H103KA55D-Murata-datasheet-39128434.pdf?src-supplier=Newark, ComponentLink2URL=https://datasheet.octopart.com:443/GCM155R71H103KA55D-Murata-datasheet-39128434.pdf?src-supplier=Newark, ComponentLink3Description=https://datasheet.octopart.com:443/GCM155R71H103KA55D-Murata-datasheet-62316942.pdf?src-supplier=element14+APAC, ComponentLink3URL=https://datasheet.octopart.com:443/GCM155R71H103KA55D-Murata-datasheet-62316942.pdf?src-supplier=element14+APAC, ComponentLink4Description=https://datasheet.octopart.com:443/GCM155R71H103KA55D-Murata-datasheet-12541648.pdf?src-supplier=_legacy+Avnet, ComponentLink4URL=https://datasheet.octopart.com:443/GCM155R71H103KA55D-Murata-datasheet-12541648.pdf?src-supplier=_legacy+Avnet, ComponentLink5Description=https://datasheet.octopart.com:443/GCM155R71H103KA55D-Murata-datasheet-14404350.pdf?src-supplier=Future+Electronics, ComponentLink5URL=https://datasheet.octopart.com:443/GCM155R71H103KA55D-Murata-datasheet-14404350.pdf?src-supplier=Future+Electronics, ComponentLink6Description=https://datasheet.octopart.com:443/GCM155R71H103KA55D-Murata-datasheet-44104302.pdf?src-supplier=Future+Electronics, ComponentLink6URL=https://datasheet.octopart.com:443/GCM155R71H103KA55D-Murata-datasheet-44104302.pdf?src-supplier=Future+Electronics, ComponentLink7Description=https://datasheet.octopart.com:443/GCM155R71H103KA55D-Murata-datasheet-141266224.pdf?src-supplier=Ciiva, ComponentLink7URL=https://datasheet.octopart.com:443/GCM155R71H103KA55D-Murata-datasheet-141266224.pdf?src-supplier=Ciiva, ComponentLink8Description=https://datasheet.octopart.com:443/GCM155R71H103KA55D-Murata-datasheet-140656749.pdf?src-supplier=Ciiva, ComponentLink8URL=https://datasheet.octopart.com:443/GCM155R71H103KA55D-Murata-datasheet-140656749.pdf?src-supplier=Ciiva, ComponentLink9Description=https://datasheet.octopart.com:443/GCM155R71H103KA55D-Murata-datasheet-138716454.pdf?src-supplier=Ciiva, ComponentLink9URL=https://datasheet.octopart.com:443/GCM155R71H103KA55D-Murata-datasheet-138716454.pdf?src-supplier=Ciiva, ComponentLink10Description=https://datasheet.octopart.com:443/GCM155R71H103KA55D-Murata-datasheet-12511495.pdf?src-supplier=TME, ComponentLink10URL=https://datasheet.octopart.com:443/GCM155R71H103KA55D-Murata-datasheet-12511495.pdf?src-supplier=TME, ComponentLink11Description=http://sigma.octopart.com:80/reach_statement/Murata-company-16.pdf?src-supplier=Compliance+Statements, ComponentLink11URL=http://sigma.octopart.com:80/reach_statement/Murata-company-16.pdf?src-supplier=Compliance+Statements, Country of Origin=Philippines, Depth=500µm, Export Control Classification Number (ECCN) Code=EAR99, Harmonized Tariff Schedule (HTS) Code=8532.24.00.20, Height=500µm, Introduction Date=2007-06-21, Lead Free="Lead Free", Length=1mm, Lifecycle Status=Production, Manufacturer Part Number=GCM155R71H103KA55D, Material=Ceramic, Mount="Surface Mount", Number of Terminals=2, Packaging="Cut Tape", Pricing 1="1=0.1, 10=0.026, 50=0.0172, 100=0.0146, 500=0.01026, 1000=0.00894, 2500=0.00756, 5000=0.00672 (USD)", Radiation Hardening=No, REACH SVHC=Yes, RoHS=Compliant, Schedule B="8532240020, 8532240020|8532240020, 8532240020|8532240020|8532240020, 8532240020|8532240020|8532240020|8532240020", Stock 1=3983526, Supplier 1=DigiKey, Termination=SMD/SMT, Voltage Rating=50V, Voltage Rating (DC)=50V, Width=500µm
C13: library part GRM155R71C224KA12D, "16V 220nF X7R ±10% 0402 Multilayer Ceramic Capacitors MLCC - SMD/SMT ROHS", Case Code (Imperial)=0402, Case Code (Metric)=1005, Dielectric=X7R, Dielectric Material=Ceramic, Manufacturer=Murata, Manufacturer Lifecycle Status="IN PRODUCTION", Max Operating Temperature=125°C, Min Operating Temperature=-55°C, Supplier Part Number 1=490-5418-6-ND, Tolerance=±10%, Voltage=16V, Capacitance=220nF, Case/Package=0402, Category="Ceramic Capacitors", ComponentLink1Description=https://datasheet.octopart.com:443/GRM155R71C224KA12D-Murata-datasheet-39128485.pdf?src-supplier=Newark, ComponentLink1URL=https://datasheet.octopart.com:443/GRM155R71C224KA12D-Murata-datasheet-39128485.pdf?src-supplier=Newark, ComponentLink2Description=https://datasheet.octopart.com:443/GRM155R71C224KA12D-Murata-datasheet-62317120.pdf?src-supplier=element14+APAC, ComponentLink2URL=https://datasheet.octopart.com:443/GRM155R71C224KA12D-Murata-datasheet-62317120.pdf?src-supplier=element14+APAC, ComponentLink3Description=https://datasheet.octopart.com:443/GRM155R71C224KA12D-Murata-datasheet-142540683.pdf?src-supplier=Geoflip, ComponentLink3URL=https://datasheet.octopart.com:443/GRM155R71C224KA12D-Murata-datasheet-142540683.pdf?src-supplier=Geoflip, ComponentLink4Description=https://datasheet.octopart.com:443/GRM155R71C224KA12D-Murata-datasheet-12524644.pdf?src-supplier=_legacy+Avnet, ComponentLink4URL=https://datasheet.octopart.com:443/GRM155R71C224KA12D-Murata-datasheet-12524644.pdf?src-supplier=_legacy+Avnet, ComponentLink5Description=https://datasheet.octopart.com:443/GRM155R71C224KA12D-Murata-datasheet-165579666.pdf?src-supplier=TME, ComponentLink5URL=https://datasheet.octopart.com:443/GRM155R71C224KA12D-Murata-datasheet-165579666.pdf?src-supplier=TME, ComponentLink6Description=https://datasheet.octopart.com:443/GRM155R71C224KA12D-Murata-datasheet-81455579.pdf?src-supplier=TME, ComponentLink6URL=https://datasheet.octopart.com:443/GRM155R71C224KA12D-Murata-datasheet-81455579.pdf?src-supplier=TME, ComponentLink7Description=https://datasheet.octopart.com:443/GRM155R71C224KA12D-Murata-datasheet-141266224.pdf?src-supplier=Ciiva, ComponentLink7URL=https://datasheet.octopart.com:443/GRM155R71C224KA12D-Murata-datasheet-141266224.pdf?src-supplier=Ciiva, ComponentLink8Description=https://datasheet.octopart.com:443/GRM155R71C224KA12D-Murata-datasheet-140691306.pdf?src-supplier=Ciiva, ComponentLink8URL=https://datasheet.octopart.com:443/GRM155R71C224KA12D-Murata-datasheet-140691306.pdf?src-supplier=Ciiva, ComponentLink9Description=https://datasheet.octopart.com:443/GRM155R71C224KA12D-Murata-datasheet-138740906.pdf?src-supplier=Ciiva, ComponentLink9URL=https://datasheet.octopart.com:443/GRM155R71C224KA12D-Murata-datasheet-138740906.pdf?src-supplier=Ciiva, ComponentLink10Description=https://datasheet.octopart.com:443/GRM155R71C224KA12D-Murata-datasheet-22122223.pdf?src-supplier=Future+Electronics, ComponentLink10URL=https://datasheet.octopart.com:443/GRM155R71C224KA12D-Murata-datasheet-22122223.pdf?src-supplier=Future+Electronics, ComponentLink11Description=https://datasheet.octopart.com:443/GRM155R71C224KA12D-Murata-datasheet-14400575.pdf?src-supplier=Future+Electronics, ComponentLink11URL=https://datasheet.octopart.com:443/GRM155R71C224KA12D-Murata-datasheet-14400575.pdf?src-supplier=Future+Electronics, ComponentLink12Description=https://datasheet.octopart.com/GRM155R71C224KA12D-Murata-datasheet-12515295.pdf, ComponentLink12URL=https://datasheet.octopart.com/GRM155R71C224KA12D-Murata-datasheet-12515295.pdf, ComponentLink13Description=https://datasheet.octopart.com/GRM155R71C224KA12D-Murata-datasheet-12510076.pdf, ComponentLink13URL=https://datasheet.octopart.com/GRM155R71C224KA12D-Murata-datasheet-12510076.pdf, ComponentLink14Description=https://datasheet.octopart.com/GRM155R71C224KA12D-Murata-datasheet-11978611.pdf, ComponentLink14URL=https://datasheet.octopart.com/GRM155R71C224KA12D-Murata-datasheet-11978611.pdf, ComponentLink15Description=https://datasheet.octopart.com/GRM155R71C224KA12D-Murata-datasheet-10025737.pdf, ComponentLink15URL=https://datasheet.octopart.com/GRM155R71C224KA12D-Murata-datasheet-10025737.pdf, ComponentLink16Description=https://datasheet.octopart.com/GRM155R71C224KA12D-Murata-datasheet-8819587.pdf, ComponentLink16URL=https://datasheet.octopart.com/GRM155R71C224KA12D-Murata-datasheet-8819587.pdf, ComponentLink17Description=https://datasheet.octopart.com/GRM155R71C224KA12D-Murata-datasheet-14396904.pdf, ComponentLink17URL=https://datasheet.octopart.com/GRM155R71C224KA12D-Murata-datasheet-14396904.pdf, ComponentLink18Description=http://sigma.octopart.com:80/reach_statement/Murata-company-16.pdf?src-supplier=Compliance+Statements, ComponentLink18URL=http://sigma.octopart.com:80/reach_statement/Murata-company-16.pdf?src-supplier=Compliance+Statements, Depth=500µm, Height=500µm, Lead Free="Lead Free", Length=1mm, Lifecycle Status=Production, Manufacturer Part Number=GRM155R71C224KA12D, Material=Ceramic, Mount="Surface Mount", Number of Pins=2, Number of Terminals=2, Packaging="Cut Tape", Pricing 1="1=0.1, 10=0.041, 50=0.0276, 100=0.0236, 500=0.01698, 1000=0.01496, 2500=0.01283, 5000=0.01155 (USD)", Radiation Hardening=No, REACH SVHC=Yes, RoHS=Compliant, Schedule B="8532240020, 8532240020|8532240020, 8532240020|8532240020|8532240020, 8532240020|8532240020|8532240020|8532240020", Stock 1=2330624, Supplier 1=DigiKey, Termination=SMD/SMT, Thickness=500µm, Voltage Rating=16V, Voltage Rating (DC)=16V, Width=500µm
C15: library part GRM188Z71E225KE43D, "25V 2.2uF X7R ±10% 0603 Multilayer Ceramic Capacitors MLCC - SMD/SMT ROHS", Dielectric Material=X7R, Manufacturer=Murata, Manufacturer Lifecycle Status="IN PRODUCTION", Max Operating Temperature=125°C, Min Operating Temperature=-55°C, Supplier Part Number 1=490-GRM188Z71E225KE43DCT-ND, Tolerance=±10%, Voltage Rating=25V, Category="Ceramic Capacitors", ComponentLink1Description=https://datasheet.octopart.com:443/GRM188Z71E225KE43D-Murata-datasheet-141276026.pdf?src-supplier=Geoflip, ComponentLink1URL=https://datasheet.octopart.com:443/GRM188Z71E225KE43D-Murata-datasheet-141276026.pdf?src-supplier=Geoflip, ComponentLink2Description=https://datasheet.octopart.com:443/GRM188Z71E225KE43D-Murata-datasheet-165579666.pdf?src-supplier=TME, ComponentLink2URL=https://datasheet.octopart.com:443/GRM188Z71E225KE43D-Murata-datasheet-165579666.pdf?src-supplier=TME, ComponentLink3Description=https://datasheet.octopart.com:443/GRM188Z71E225KE43D-Murata-datasheet-140705919.pdf?src-supplier=Ciiva, ComponentLink3URL=https://datasheet.octopart.com:443/GRM188Z71E225KE43D-Murata-datasheet-140705919.pdf?src-supplier=Ciiva, ComponentLink4Description=https://datasheet.octopart.com:443/GRM188Z71E225KE43D-Murata-datasheet-138743437.pdf?src-supplier=Ciiva, ComponentLink4URL=https://datasheet.octopart.com:443/GRM188Z71E225KE43D-Murata-datasheet-138743437.pdf?src-supplier=Ciiva, ComponentLink5Description=http://sigma.octopart.com:80/reach_statement/Murata-company-16.pdf?src-supplier=Compliance+Statements, ComponentLink5URL=http://sigma.octopart.com:80/reach_statement/Murata-company-16.pdf?src-supplier=Compliance+Statements, Export Control Classification Number (ECCN) Code=EAR99, Harmonized Tariff Schedule (HTS) Code=8532.24.00.20, Height=800µm, Introduction Date=2017-02-21, Length=1.6mm, Lifecycle Status=Production, Manufacturer Part Number=GRM188Z71E225KE43D, Material=Ceramic, Mount="Surface Mount", Number of Terminals=2, Pricing 1="1=0.17, 10=0.096, 50=0.068, 100=0.0593, 500=0.04474, 1000=0.04026 (USD)", REACH SVHC=Yes, RoHS=Compliant, Stock 1=149124, Supplier 1=DigiKey, Thickness=800µm, Voltage Rating (DC)=25V, Width=800µm
D1 D2: "Trans Voltage Suppressor Diode, 350W, 5V V(RWM), Unidirectional, 1 Element, Silicon", Clamping Voltage=14.5V, Manufacturer="Sangdest Microelectronics", Max Operating Temperature=125°C, Min Breakdown Voltage=6V, Min Operating Temperature=-55°C, Peak Pulse Power=350W, Peak Reverse Current=10µA, Reverse Standoff Voltage=5V, Supplier Part Number 1=1655-SD05CT-ND, Category="TVS Diodes", ComponentLink1Description=https://datasheet.octopart.com:443/SD05-SMC-Diode-Solutions-datasheet-181400473.pdf?src-supplier=IHS, ComponentLink1URL=https://datasheet.octopart.com:443/SD05-SMC-Diode-Solutions-datasheet-181400473.pdf?src-supplier=IHS, Lifecycle Status=Production, Manufacturer Part Number=SD05, Number of Elements=1, Number of Terminals=2, Polarity=Unidirectional, Pricing 1="1=0.27, 10=0.165, 100=0.1025, 500=0.0752, 1000=0.06636 (USD)", REACH SVHC=Yes, RoHS=Compliant, Stock 1=13210, Supplier 1=DigiKey
LED1: library part LTST-C190KGKT, "LED yellow green 0603 wavelength 567.5nm~576.5nm light intensity 18mcd~71mcd Front Mounting", Case Code (Imperial)=0603, Case Code (Metric)=1608, Color=Green, Forward Current=30mA, Forward Voltage=2.15V, Lens Color="Clear, Colorless", Manufacturer="Diodes Inc.", Max Operating Temperature=85°C, Min Operating Temperature=-30°C, Power Dissipation=75mW, Reverse Voltage=5V, Test Current=20mA, Case/Package=0603, Category=LEDs, China RoHS=Compliant, ComponentLink1Description=https://datasheet.octopart.com:443/LTST-C190KGKT-Lite-On-datasheet-86397316.pdf?src-supplier=ODG+(Origin+Data+Global), ComponentLink1URL=https://datasheet.octopart.com:443/LTST-C190KGKT-Lite-On-datasheet-86397316.pdf?src-supplier=ODG+(Origin+Data+Global), ComponentLink2Description=https://datasheet.octopart.com:443/LTST-C190KGKT-Lite-On-datasheet-180605179.pdf?src-supplier=IHS, ComponentLink2URL=https://datasheet.octopart.com:443/LTST-C190KGKT-Lite-On-datasheet-180605179.pdf?src-supplier=IHS, ComponentLink3Description=https://datasheet.octopart.com:443/LTST-C190KGKT-Lite-On-datasheet-13693967.pdf?src-supplier=Factory+Futures, ComponentLink3URL=https://datasheet.octopart.com:443/LTST-C190KGKT-Lite-On-datasheet-13693967.pdf?src-supplier=Factory+Futures, ComponentLink4Description=https://datasheet.octopart.com:443/LTST-C190KGKT-Lite-On-datasheet-165573809.pdf?src-supplier=TME, ComponentLink4URL=https://datasheet.octopart.com:443/LTST-C190KGKT-Lite-On-datasheet-165573809.pdf?src-supplier=TME, ComponentLink5Description=https://datasheet.octopart.com:443/LTST-C190KGKT-Lite-On-datasheet-165573808.pdf?src-supplier=TME, ComponentLink5URL=https://datasheet.octopart.com:443/LTST-C190KGKT-Lite-On-datasheet-165573808.pdf?src-supplier=TME, ComponentLink6Description=https://datasheet.octopart.com:443/LTST-C190KGKT-Lite-On-datasheet-43775815.pdf?src-supplier=TME, ComponentLink6URL=https://datasheet.octopart.com:443/LTST-C190KGKT-Lite-On-datasheet-43775815.pdf?src-supplier=TME, ComponentLink7Description=https://datasheet.octopart.com:443/LTST-C190KGKT-Lite-On-datasheet-32046999.pdf?src-supplier=Future+Electronics, ComponentLink7URL=https://datasheet.octopart.com:443/LTST-C190KGKT-Lite-On-datasheet-32046999.pdf?src-supplier=Future+Electronics, ComponentLink8Description=https://datasheet.octopart.com:443/LTST-C190KGKT-Lite-On-datasheet-8326678.pdf?src-supplier=Future+Electronics, ComponentLink8URL=https://datasheet.octopart.com:443/LTST-C190KGKT-Lite-On-datasheet-8326678.pdf?src-supplier=Future+Electronics, ComponentLink9Description=https://datasheet.octopart.com:443/LTST-C190KGKT-Lite-On-datasheet-78838574.pdf?src-supplier=Future+Electronics, ComponentLink9URL=https://datasheet.octopart.com:443/LTST-C190KGKT-Lite-On-datasheet-78838574.pdf?src-supplier=Future+Electronics, ComponentLink10Description=https://datasheet.octopart.com:443/LTST-C190KGKT-Lite-On-datasheet-158288.pdf?src-supplier=Mouser, ComponentLink10URL=https://datasheet.octopart.com:443/LTST-C190KGKT-Lite-On-datasheet-158288.pdf?src-supplier=Mouser, ComponentLink11Description=https://datasheet.octopart.com:443/LTST-C190KGKT-Lite-On-datasheet-49281.pdf?src-supplier=DigiKey, ComponentLink11URL=https://datasheet.octopart.com:443/LTST-C190KGKT-Lite-On-datasheet-49281.pdf?src-supplier=DigiKey, ComponentLink12Description=https://datasheet.octopart.com:443/LTST-C190KGKT-Lite-On-datasheet-14174998.pdf?src-supplier=iiiC, ComponentLink12URL=https://datasheet.octopart.com:443/LTST-C190KGKT-Lite-On-datasheet-14174998.pdf?src-supplier=iiiC, Depth=800µm, Dominant Wavelength=571nm, Height=800µm, Illumination Color=Green, Lead Free="Lead Free", Length=1.6mm, Lens Style=Clear, Lens Transparency=Clear, Lifecycle Status=Production, Luminous Intensity=35mcd, Manufacturer Part Number=LTST-C190KGKT, Mount="Surface Mount", Number of Circuits=1, Number of Elements=1, Number of LEDs=1, Number of Pins=2, Number of Terminals=2, Peak Wavelength=574nm, Power Rating=75mW, Pricing 1="1=0.13, 10=0.088, 100=0.0603, 500=0.04758, 1000=0.04332, 2000=0.03968 (USD)", Radiation Hardening=No, REACH SVHC=Yes, RoHS=Compliant, Schedule B="8541402000, 8541402000|8541402000|8541402000|8541402000|8541402000|8541402000|8541402000|8541402000|8541402000|8541402000|8541402000|8541402000|8541402000|8541402000|8541402000|8541402000|8541402000|8541402000|8541402000|8541402000|8541402000|8541402000|8541402000|85", Shape=Rectangular, Stock 1=2033232, Supplier 1=DigiKey, Terminal Pitch=1.5mm, Viewing Angle=130°, Wavelength=574nm, Width=800µm
P1: library part SM10B-SRSS-TB_1, "Board Connector, 10 Contact(s), 1 Row(s), Male, Right Angle, Surface Mount Terminal", Color=Natural, Manufacturer=JST, Category="Card Edge Connectors", ComponentLink1Description=https://datasheet.octopart.com:443/SM10B-SRSS-TB-JST-datasheet-180492086.pdf?src-supplier=IHS, ComponentLink1URL=https://datasheet.octopart.com:443/SM10B-SRSS-TB-JST-datasheet-180492086.pdf?src-supplier=IHS, ComponentLink2Description=https://datasheet.octopart.com:443/SM10B-SRSS-TB-JST-datasheet-118603.pdf?src-supplier=DigiKey, ComponentLink2URL=https://datasheet.octopart.com:443/SM10B-SRSS-TB-JST-datasheet-118603.pdf?src-supplier=DigiKey, Connector Type="Male Pin", Contact Plating=Tin, Export Control Classification Number (ECCN) Code=EAR99, Gender=Male, Harmonized Tariff Schedule (HTS) Code=8536.69.40.40, Housing Color=Natural, Housing Material=Nylon, Introduction Date=1996-04-01, Lead Free="Contains Lead", Lifecycle Status=Obsolete, Manufacturer Part Number=SM10B-SRSS-TB, Mount="Surface Mount", Number of Contacts=10, Number of Pins=10, Number of Positions=10, Number of Rows=1, Orientation="Right Angle", Pitch=990.6µm, Pricing 1="1=0.93, 10=0.788, 100=0.6694, 500=0.59746, 1000=0.56894 (USD)", RoHS=Compliant, Stock 1=3469, Supplier 1=DigiKey, Terminal Pitch=1mm, Termination=Solder
P2: library part SM05B-SRSS-TB-SWD, "Board Connector, 5 Contact(s), 1 Row(s), Male, Right Angle, Surface Mount Terminal", Color=Natural, Manufacturer=JST, Category="Card Edge Connectors", ComponentLink1Description=https://datasheet.octopart.com:443/SM05B-SRSS-TB-JST-datasheet-180492086.pdf?src-supplier=IHS, ComponentLink1URL=https://datasheet.octopart.com:443/SM05B-SRSS-TB-JST-datasheet-180492086.pdf?src-supplier=IHS, ComponentLink2Description=https://datasheet.octopart.com:443/SM05B-SRSS-TB-JST-datasheet-118603.pdf?src-supplier=DigiKey, ComponentLink2URL=https://datasheet.octopart.com:443/SM05B-SRSS-TB-JST-datasheet-118603.pdf?src-supplier=DigiKey, ComponentLink3Description=https://datasheet.octopart.com:443/SM05B-SRSS-TB-JST-datasheet-152738602.pdf?src-supplier=Amar+Radio+Corporation, ComponentLink3URL=https://datasheet.octopart.com:443/SM05B-SRSS-TB-JST-datasheet-152738602.pdf?src-supplier=Amar+Radio+Corporation, Connector Type="Male Pin", Contact Plating=Tin, Export Control Classification Number (ECCN) Code=EAR99, Gender=Male, Harmonized Tariff Schedule (HTS) Code=8536.69.40.40, Housing Color=Natural, Housing Material=Nylon, Introduction Date=1996-04-01, Lead Free="Contains Lead", Lifecycle Status=Obsolete, Manufacturer Part Number=SM05B-SRSS-TB, Mount="Surface Mount", Number of Contacts=5, Number of Positions=5, Number of Rows=1, Orientation="Right Angle", Pitch=990.6µm, Pricing 1="1=0.62, 10=0.527, 100=0.4477, 500=0.3996, 1000=0.38051 (USD)", RoHS=Compliant, Stock 1=42194, Supplier 1=DigiKey, Terminal Pitch=1mm, Termination=Solder
P3: library part SM03B-SRSS-TB_UART, "Board Connector, 3 Contact(s), 1 Row(s), Male, Right Angle, Surface Mount Terminal", Color=Natural, Manufacturer=JST, Max Operating Temperature=85°C, Min Operating Temperature=-25°C, Category="Card Edge Connectors", ComponentLink1Description=https://datasheet.octopart.com:443/SM03B-SRSS-TB-JST-datasheet-180492086.pdf?src-supplier=IHS, ComponentLink1URL=https://datasheet.octopart.com:443/SM03B-SRSS-TB-JST-datasheet-180492086.pdf?src-supplier=IHS, ComponentLink2Description=https://datasheet.octopart.com:443/SM03B-SRSS-TB-JST-datasheet-44103209.pdf?src-supplier=TME, ComponentLink2URL=https://datasheet.octopart.com:443/SM03B-SRSS-TB-JST-datasheet-44103209.pdf?src-supplier=TME, ComponentLink3Description=https://datasheet.octopart.com:443/SM03B-SRSS-TB-JST-datasheet-118603.pdf?src-supplier=DigiKey, ComponentLink3URL=https://datasheet.octopart.com:443/SM03B-SRSS-TB-JST-datasheet-118603.pdf?src-supplier=DigiKey, ComponentLink4Description=https://datasheet.octopart.com:443/SM03B-SRSS-TB-JST-datasheet-152738602.pdf?src-supplier=Amar+Radio+Corporation, ComponentLink4URL=https://datasheet.octopart.com:443/SM03B-SRSS-TB-JST-datasheet-152738602.pdf?src-supplier=Amar+Radio+Corporation, Connector Type="Male Pin", Contact Gender=Male, Contact Plating=Tin, Housing Color=Natural, Housing Material=Nylon, Lead Free="Contains Lead", Lifecycle Status=Obsolete, Manufacturer Part Number=SM03B-SRSS-TB, Mount="Surface Mount", Number of Contacts=3, Number of Pins=3, Number of Positions=3, Number of Rows=1, Orientation=Horizontal, Pitch=990.6µm, Pricing 1="1=0.44, 10=0.373, 100=0.317, 500=0.2829, 1000=0.26938 (USD)", RoHS=Compliant, Stock 1=14167, Supplier 1=DigiKey, Terminal Pitch=1mm, Termination=Solder
R1: library part RCS0402300RFKED, "300Ω RCS e3 0402 0402 (1005Metric) Chip Resistor ±1% ±100ppm/C 300Ohms 0.2W 1/5W", Case/Package=0402, Manufacturer=Vishay, Max Operating Temperature=155°C, Max Power Dissipation=200mW, Min Operating Temperature=-55°C, Ratings=AEC-Q200, Resistance=300Ω, Temperature Coefficient=100ppm/°C, Tolerance=±1%, Working Voltage=50V, Category="Chip SMD Resistors", China RoHS=Non-Compliant, ComponentLink1Description=https://datasheet.octopart.com:443/RCS0402300RFKED-Vishay-datasheet-176436275.pdf?src-supplier=IHS, ComponentLink1URL=https://datasheet.octopart.com:443/RCS0402300RFKED-Vishay-datasheet-176436275.pdf?src-supplier=IHS, ComponentLink2Description=http://sigma.octopart.com:80/rohs_statement/Vishay-company-15.pdf?src-supplier=Compliance+Statements, ComponentLink2URL=http://sigma.octopart.com:80/rohs_statement/Vishay-company-15.pdf?src-supplier=Compliance+Statements, Composition="Thick Film", Country of Origin="Israel, Mainland China", Export Control Classification Number (ECCN) Code=EAR99, Features="Automotive AEC-Q200", Harmonized Tariff Schedule (HTS) Code=8533.21.00.30, Height=350µm, Introduction Date=2016-07-12, Length=1mm, Lifecycle Status=Production, Manufacturer Part Number=RCS0402300RFKED, Mount="Surface Mount", Number of Terminals=2, Number of Terminations=2, Power Rating=200mW, Pricing 1="1=0.13, 10=0.06, 25=0.0464, 50=0.0386, 100=0.0325, 250=0.0264, 500=0.02292, 1000=0.02015, 5000=0.01575 (USD)", REACH SVHC=Yes, RoHS=Compliant, Stock 1=8281, Supplier 1=DigiKey, Width=500µm